# Altium PCB SyncBoard1.PcbDoc (part 4 of 4)
Units mm, origin at the board's own origin, x right, y up, seen from the top; angles counter-clockwise.
Board outline 300 x 250 mm, 2 copper layers (Top Layer, Bottom Layer); 311 components, 299 nets, 1572 pads, 3310 vias.
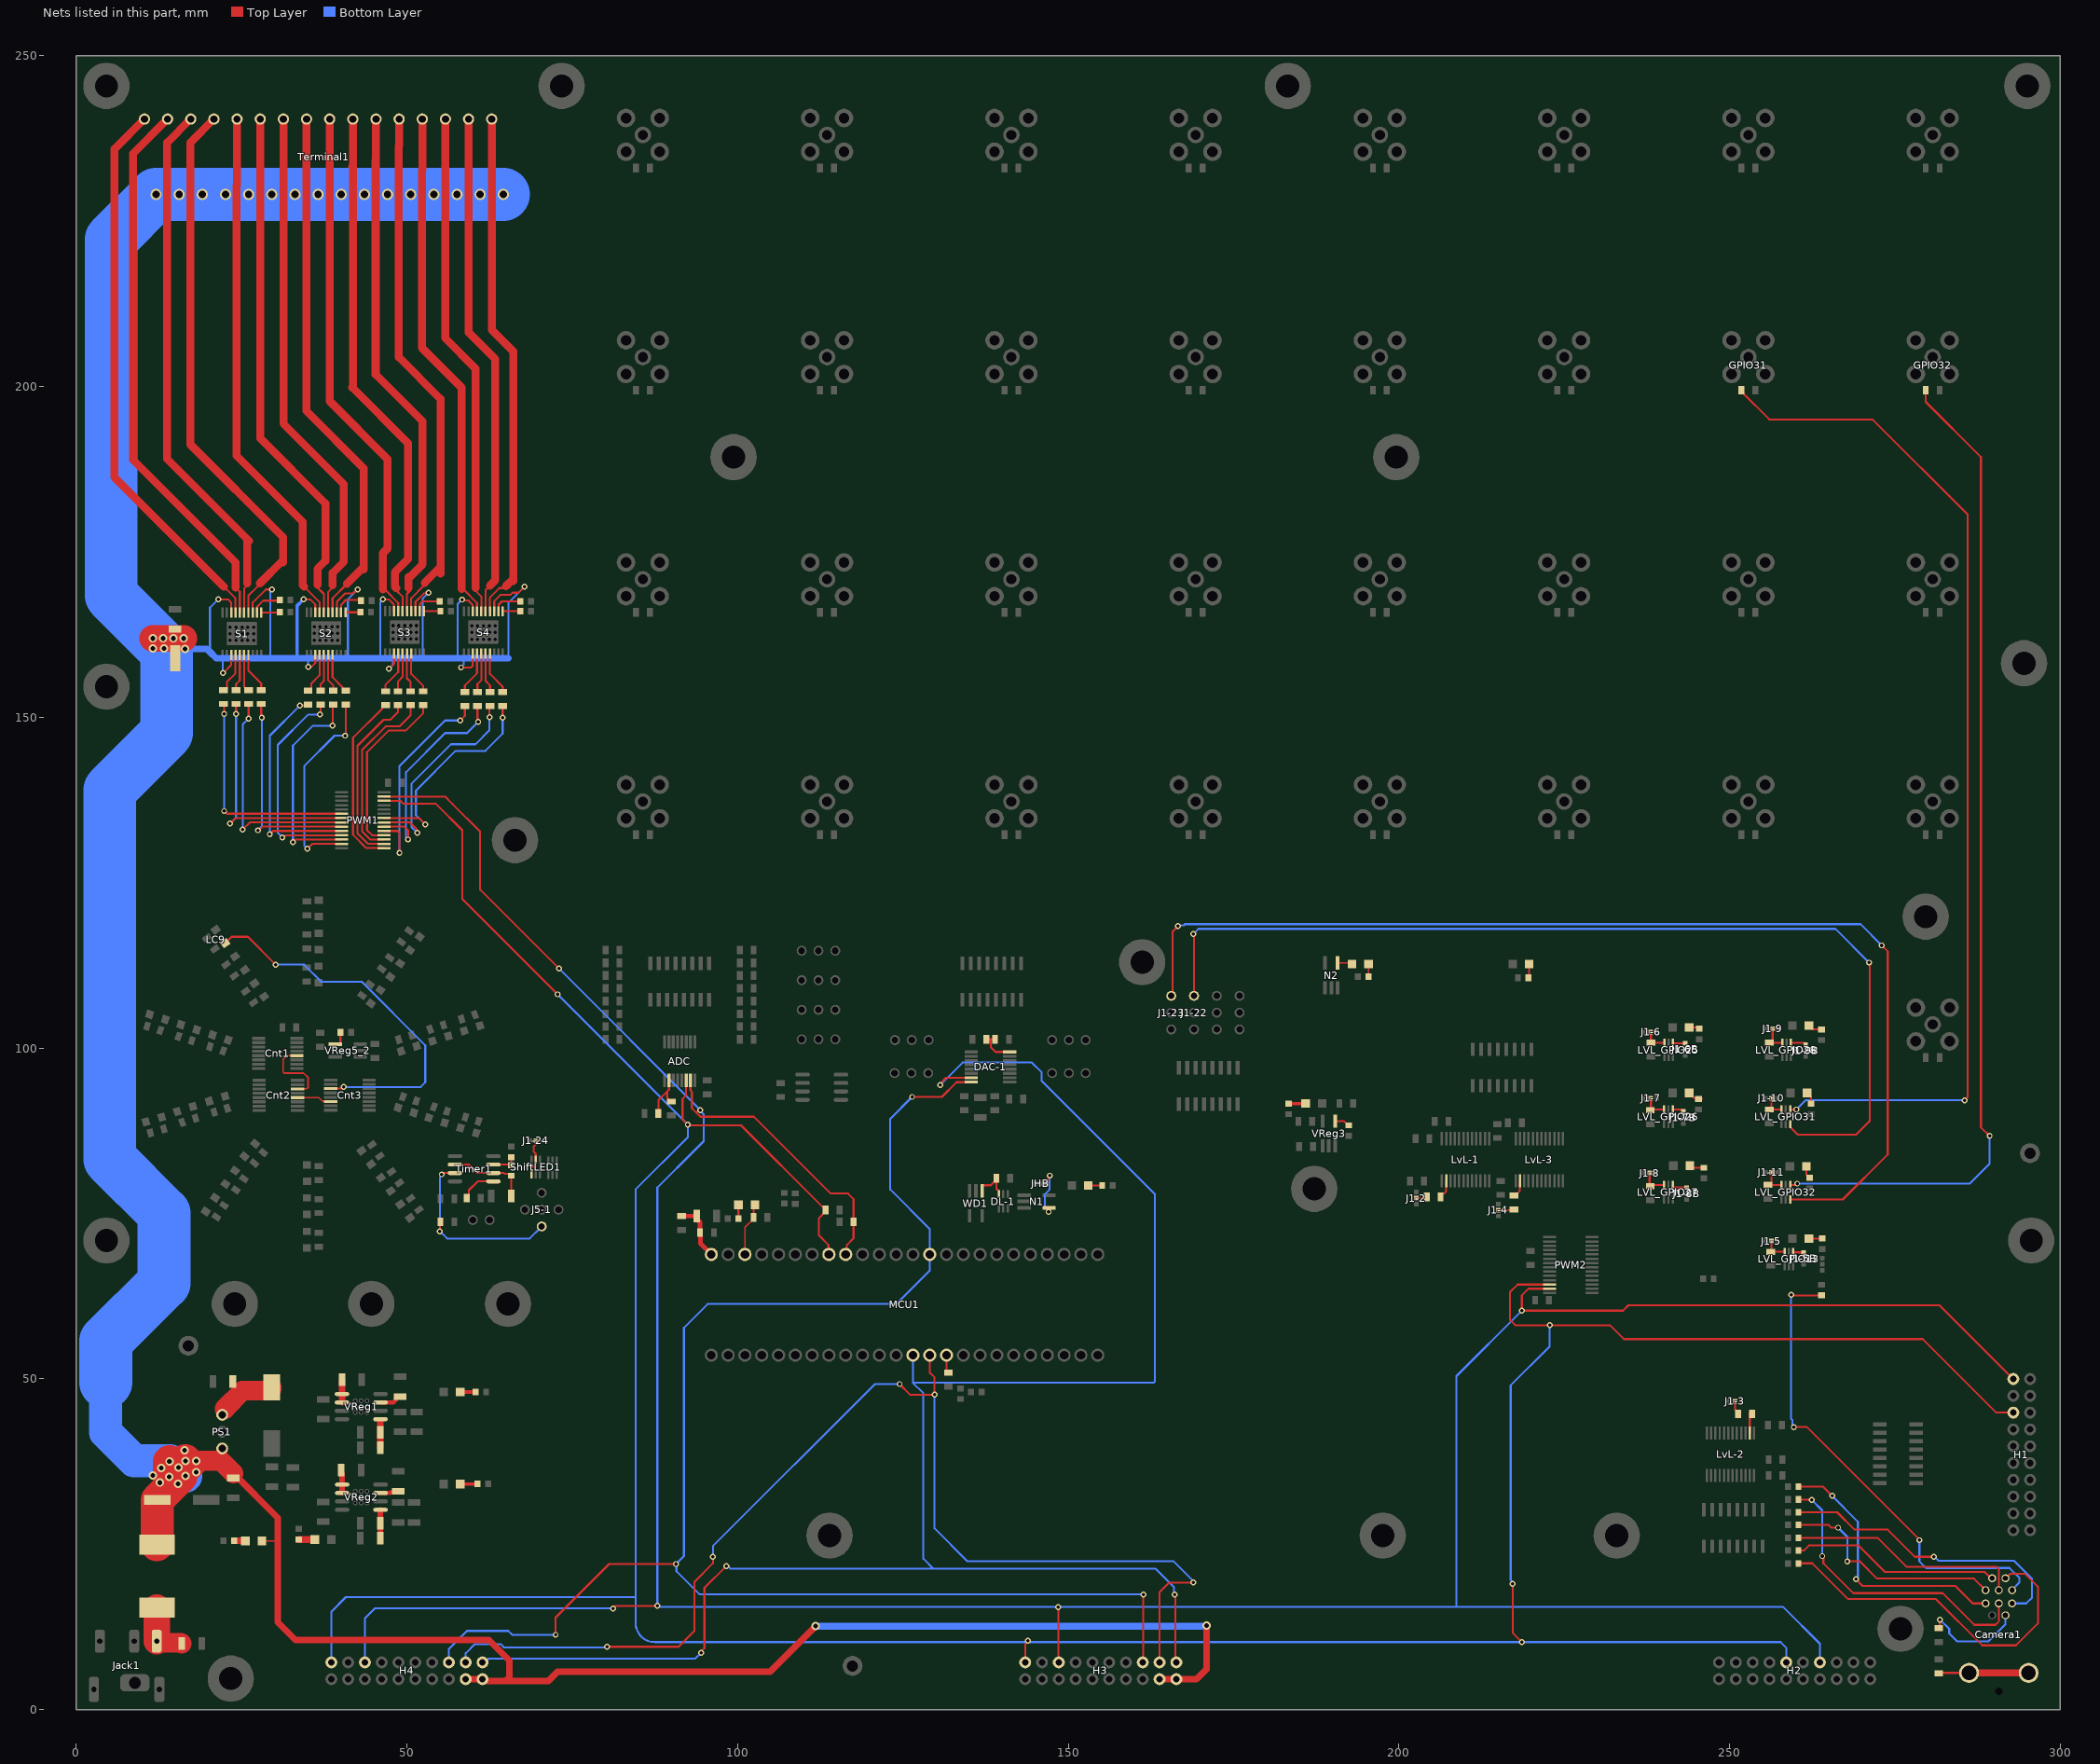
[diagram p4: the nets of this part, all layers, seen from the top]

## Via types
v1: diameter 0.9, hole 0.5, Top Layer to Bottom Layer, tented both sides, 3146 vias
v2: diameter 1.27, hole 0.711, Top Layer to Bottom Layer, tented both sides, 164 vias

## Nets (pads, with @x,y where several pads share a name; then routed paths per layer and width w, separated by ;. In a path a pad name is that pad's centre, name@x,y a point inside that pad or via, vN(x,y) a via of type N, cw(c..) or ccw(c..) an arc to the next point about the centre after c; other vN are vias at no path point) (continued)
LC9: Cnt3.11 LC9.1 | length 57.7
  Top Layer w0.3: LC9.1@22.568,115.843 23.525,116.8 26,116.8 v1(30.2,112.6) ; Cnt3.11@38.5,93.85 40.25,93.85 v1(40.5,94.1)
  Bottom Layer w0.3: v1(30.2,112.6) 34.5,112.6 37.1,110 43.21,110 52.8,100.41 52.8,94.8 52.1,94.1 v1(40.5,94.1)
MISO0: H3.19 H4.19 MCU1.13 | length 181.2
  Top Layer w0.3: v1(80.3,9.5) 91.1,9.5 93.5,11.9 93.5,19.3 96.3,22.1 v1(96.3,23.1) ; v1(124.5,49.2) 126.1,47.6 v1(129.8,47.6) 129.8,50.207 129.066,50.941 MCU1.13@129.066,53.56 ; H3.19@163.82,7.14 163.82,17.72 165.3,19.2 v1@168.7,19.2
  Bottom Layer w0.3: H4.19@58.92,7.14 58.92,8.52 60.3,9.9 64.2,9.9 64.7,9.4 80.2,9.4 v1(80.3,9.5) ; v1(96.3,23.1) 96.3,24.7 120.8,49.2 v1(124.5,49.2) ; v1(129.8,47.6) 129.8,27.376 134.776,22.4 165.939,22.4 168.9,19.439 v1(168.9,19.2)
MOSI0: DAC-1.15 H3.20 H4.20 MCU1.12 | length 275.5
  Top Layer w0.3: v1(94.5,8.6) 94.5,8.761 95,9.261 95,18.4 v1(98.3,21.7) ; v1(130.643,94.414) 130.643,94.609 131.534,95.5 DAC-1.15@135.346,95.5 ; v1(166.1,17.4) 166.23,17.27 166.23,7.27 H3.20@166.36,7.14
  Bottom Layer w0.3: H4.20@61.46,7.14 61.826,7.14 62.386,7.7 93.6,7.7 v1(94.5,8.6) ; v1(98.3,21.7) 98.561,21.7 98.961,21.3 129.6,21.3 ; MCU1.12@126.526,53.56 126.526,49.4 ; v1(130.643,94.414) 134.029,97.8 144.5,97.8 146,96.3 146,95 163.1,77.9 163.1,49.576 162.924,49.4 126.526,49.4 ; v1(166.1,17.4) 166.015,17.485 166.015,18.485 163.2,21.3 129.6,21.3 ; 126.526,49.4 128.1,47.826 128.1,22.8 129.6,21.3
NetADC_10: ADC.10 R3-3.1 R4-4.2 | length 7.6
  Top Layer w0.3: R4-4.2@88.046,90.1 88.046,92.1 89.373,93.427 ; ADC.10@89.646,95.1 89.646,93.7 89.373,93.427 ; R3-3.1@90,91.9 89.8,91.9 89.5,92.2 89.5,92.4 89.373,92.527 89.373,93.427
NetC1-3_2: C1-3.2 C2-2.1 MCU1.47 R4-3.2 | length 9
  Top Layer w0.7: R4-3.2@91.546,74.6 C2-2.1@93.846,74.6 93.846,74.15 94.346,73.65 C1-3.2@94.346,72.1 94.4,72.046 94.4,70.446 MCU1.47@96.046,68.8
NetC1-10_1: C1-10.1 DAC-1.8 R5-9.2 | length 5.6
  Top Layer w0.3: R5-9.2@137.646,101.3 138.296,101.3 ; C1-10.1@138.946,101.3 138.296,101.3 ; DAC-1.8@141.146,99.4 139,99.4 138.296,100.104 138.296,101.3
NetC1-18_2: C1-18.2 J1-5.2 LVL_GPIO13.6 | length 3.7
  Top Layer w0.3: J1-5.2@256.3,70.8 256.3,69.3 C1-18.2@256.2,69.2 LVL_GPIO13.6@258.3,69.2
NetC1-19_2: C1-19.2 J1-6.2 LVL_GPIO25.6 | length 3.6
  Top Layer w0.3: J1-6.2@238.1,102.4 C1-19.2@238.1,100.8 LVL_GPIO25.6@240.15,100.8
NetC1-20_2: C1-20.2 J1-7.2 LVL_GPIO26.6 | length 3.8
  Top Layer w0.3: C1-20.2@238,90.6 C1-20.2@238.1,90.7 ; J1-7.2@238.1,92.4 C1-20.2@238.1,90.7 ; LVL_GPIO26.6@240.1,90.7 C1-20.2@238.1,90.7
NetC1-21_2: C1-21.2 J1-8.2 LVL_GPIO27.6 | length 4.2
  Top Layer w0.3: J1-8.2@237.9,81.1 237.9,79.2 C1-21.2@238,79.1 238.2,79.3 LVL_GPIO27.6@240.1,79.3
NetC1-22_2: C1-22.2 J1-9.2 LVL_GPIO28.6 | length 4.2
  Top Layer w0.3: C1-22.2@256,100.8 C1-22.2@256.2,100.8 ; J1-9.2@256.5,102.9 256.5,101.1 C1-22.2@256.2,100.8 ; LVL_GPIO28.6@257.95,100.8 C1-22.2@256.2,100.8
NetC1-23_2: C1-23.2 J1-10.2 LVL_GPIO31.6 | length 3.7
  Top Layer w0.3: J1-10.2@256.3,92.4 256.3,91 C1-23.2@256,90.7 LVL_GPIO31.6@257.85,90.7
NetC1-24_2: C1-24.2 J1-11.2 LVL_GPIO32.6 | length 4.1
  Top Layer w0.3: C1-24.2@255.8,79.3 C1-24.2@256,79.3 ; J1-11.2@256.3,81.2 256.3,79.6 C1-24.2@256,79.3 ; LVL_GPIO32.6@257.85,79.3 C1-24.2@256,79.3
NetC1-26_1: C1-26.1 Timer1.5 | length 5.6
  Top Layer w0.3: C1-26.1@59.1,77.3 59.4,77.6 59.4,78.5 60.73,79.83 Timer1.5@63.1,79.83
NetC3-3_1: C3-3.1 F0.1 PS1.3 | length 8.7
  Top Layer w3: 22.5,45.4 22.5,45.5 25.2,48.2 29.35,48.2 29.6,48.45 F0.1@29.6,48.7
NetC4-1_1: C4-1.1 C4-2.1 VReg1.1 | length 4
  Top Layer w1: C4-2.1@46,39.6 46,40.05 46.021,40.071 VReg1.1@46.021,43.6
NetC4-6_2: C4-6.2 VReg1.5 VReg1.6 | length 3.5
  Top Layer w1: C4-6.2@40.2,49.9 40.2,49.45 40.221,49.429 VReg1.5@40.221,47.694 VReg1.6@40.221,46.424
NetC4-7_2: C4-7.2 VReg1.3 | length 3.5
  Top Layer w0.6: VReg1.3@46.021,46.424 47.999,46.424 48.35,46.775 48.35,47.1 48.55,47.3 C4-7.2@49,47.3
NetC4-8_1: C4-8.1 C4-9.1 VReg2.1 | length 4.3
  Top Layer w0.8: C4-8.1@46,25.9 46.016,25.916 46.016,30.179 VReg2.1@46.032,30.195
NetC4-13_2: C4-13.2 VReg2.5 VReg2.6 | length 3.5
  Top Layer w0.8: C4-13.2@40.1,36.2 40.1,35.75 40.232,35.618 VReg2.5@40.232,34.005 VReg2.6@40.232,32.735
NetC4-14_2: C4-14.2 VReg2.3 | length 1.7
  Top Layer w0.6: VReg2.3@46.032,32.735 47.535,32.735 47.7,32.9
NetC8-1_2: C8-1.2 VReg3.4 | length 2.3
  Top Layer w0.254: VReg3.4@190.35,88.95 191.7,88.95 192.35,88.3 C8-1.2@192.4,88.3
NetC8-2_2: C8-2.2 VReg5_2.4 | length 2.5
  Top Layer w0.3: VReg5_2.4@39.206,100.557 39.851,100.557 39.976,100.682 C8-2.2@39.976,102.359
NetCamera1_1: Camera1.1 R3-4.2 | length 13.6
  Top Layer w0.3: R3-4.2@281.6,5.5 281.65,5.55 Camera1.1@286.2,5.55
  Top Layer w1: Camera1.1@286.2,5.55 Camera1.1@295.2,5.55
NetCamera1_3: Camera1.3 R3-5.2 | length 15.5
  Top Layer w0.3: R3-5.2@281.6,12.3 281.8,12.5 v1(281.8,13.6)
  Bottom Layer w0.3: v1(281.8,13.6) 283.193,12.207 283.193,11.507 284.4,10.3 289.1,10.3 291.7,12.9 Camera1.3@291.7,14.25
NetCamera1_4: Camera1.4 F1.1 | length 41.1
  Top Layer w0.3: F1.1@260.4,33.7 264.1,33.7 v1(265.5,32.3) ; v1(269.1,19.7) 270.1,18.7 284.1,18.7 286.75,16.05 Camera1.4@288.7,16.05
  Bottom Layer w0.3: v1(265.5,32.3) 269.4,28.4 269.4,20 v1(269.1,19.7)
NetCamera1_5: Camera1.5 F2.1 | length 45.7
  Top Layer w0.254: 290.4,13 290.7,13.3 Camera1.5@290.7,16.05
  Top Layer w0.3: F2.1@260.4,31.767 260.467,31.7 v1(262.4,31.7) ; v1(264,23.2) 264.185,23.015 264.185,22.115 268.7,17.6 282.2,17.6 287,12.8 290.2,12.8 290.4,13
  Bottom Layer w0.3: v1(262.4,31.7) 264,30.1 v1(264,23.2)
NetCamera1_6: Camera1.6 F3.1 | length 45.7
  Top Layer w0.3: F3.1@260.4,29.833 266.267,29.833 268.9,27.2 273.9,27.2 278,23.1 v1(280.9,23.1)
  Bottom Layer w0.3: v1(280.9,23.1) 280.961,23.1 281.561,22.5 293,22.5 295.7,19.8 295.7,16.9 294.85,16.05 Camera1.6@292.7,16.05
NetCamera1_7: Camera1.7 F4.1 | length 34.5
  Top Layer w0.3: F4.1@260.4,27.9 264.973,27.9 265.373,27.5 v1(266.4,27.5) ; v1(267.8,22.4) 269.7,22.4 272.3,19.8 286.95,19.8 Camera1.7@288.7,18.05
  Bottom Layer w0.3: v1(266.4,27.5) 267.8,26.1 v1(267.8,22.4)
NetCamera1_8: Camera1.8 F5.1 | length 35.4
  Top Layer w0.254: 290.6,21.3 290.7,21.2 Camera1.8@290.7,18.05
  Top Layer w0.3: F5.1@260.4,25.967 272.333,25.967 276.7,21.6 290.3,21.6 290.6,21.3
NetCamera1_9: Camera1.9 F6.1 | length 72.6
  Top Layer w0.3: v1(259.3,62.7) 259.4,62.6 F6.1@263.9,62.6 ; v1(259.7,42.7) 261.7,42.7 278.7,25.7 v1(278.7,25.6)
  Bottom Layer w0.3: v1(259.3,62.7) 259.3,43.935 259.514,43.721 259.514,42.886 v1(259.7,42.7) ; v1(278.7,25.6) 278.7,22.4 279.7,21.4 292.3,21.4 293.8,19.9 293.8,19.2 292.7,18.1 Camera1.9@292.7,18.05
NetCamera1_10: Camera1.10 F7.1 | length 31.7
  Top Layer w0.3: F7.1@260.4,24.033 261.233,24.033 262,24.8 269.5,24.8 273.5,20.8 288.565,20.8 289.515,19.85 Camera1.10@289.7,19.85
NetCamera1_11: Camera1.11 F8.1 | length 54.3
  Top Layer w0.3: F8.1@260.4,22.1 262.5,22.1 267.9,16.7 281.2,16.7 288.2,9.7 293.3,9.7 296.6,13 296.6,18.6 294.7,20.5 292.4,20.5 291.75,19.85 Camera1.11@291.7,19.85
NetCnt1_12: Cnt1.12 Cnt2.14 | length 11.6
  Top Layer w0.254: Cnt1.12@33.4,98.85 31.85,98.85 31.3,98.3 31.3,96.349 31.449,96.2 34.4,96.2 35.1,95.5 35.1,94.027 34.951,93.878 ; Cnt2.14@33.5,93.8 Cnt2.14@33.578,93.878 ; Cnt2.14@33.578,93.828 34.951,93.828
NetCnt2_12: Cnt2.12 Cnt3.14 | length 5.2
  Top Layer w0.254: Cnt2.12@33.5,92.5 36.7,92.5 37.272,91.928 38.472,91.928 Cnt3.14@38.5,91.9
NetDIR_13=OUT_1: DIR_13=OUT.1 R6-1.1 | length 2
  Top Layer w0.3: DIR_13=OUT.1@262,71.2 R6-1.1@264,71.2
NetDIR_25=OUT_1: DIR_25=OUT.1 R6-2.1 | length 1.5
  Top Layer w0.3: DIR_25=OUT.1@243.9,103.1 R6-2.1@245.45,103.1
NetDIR_26=OUT_1: DIR_26=OUT.1 R6-3.1 | length 2.3
  Top Layer w0.3: DIR_26=OUT.1@243.9,93.2 244.8,92.3 R6-3.1@245.8,92.3
NetDIR_27=OUT_1: DIR_27=OUT.1 R6-4.1 | length 1.9
  Top Layer w0.3: DIR_27=OUT.1@244,82.2 244.3,81.9 R6-4.1@245.819,81.9
NetDIR_28=OUT_1: DIR_28=OUT.1 R6-5.1 | length 2.1
  Top Layer w0.3: DIR_28=OUT.1@262,103.4 262.6,102.8 R6-5.1@263.9,102.8
NetDIR_31=OUT_1: DIR_31=OUT.1 R6-6.1 | length 1.8
  Top Layer w0.3: DIR_31=OUT.1@261.7,93.2 262.3,92.6 R6-6.1@262.3,91.6
NetDIR_32=OUT_1: DIR_32=OUT.1 R6-7.1 | length 1.9
  Top Layer w0.3: DIR_32=OUT.1@261.6,82.1 261.6,80.85 262.05,80.4 R6-7.1@262.1,80.4
NetDL-1_6: DL-1.6 R1-30.2 WD1.1 | length 5.8
  Top Layer w0.3: WD1.1@136.996,78.4 136.996,79.125 137.121,79.25 138.296,79.25 R1-30.2@139.146,80.1 ; R1-30.2@139.146,80.3 R1-30.2@139.146,80.1 ; DL-1.6@139.546,77.9 139.546,78.325 139.146,78.725 R1-30.2@139.146,80.1
NetJ1-2_2: J1-2.2 R1-8.2 | length 1.7
  Top Layer w0.3: J1-2.2@202.6,77.3 204,77.3 R1-8.2@204.2,77.5
NetJ1-3_2: J1-3.2 R1-10.2 | length 2.5
  Top Layer w0.3: J1-3.2@250.8,46.6 250.8,45.4 R1-10.2@251.25,44.95 ; R1-10.2@251,44.7 R1-10.2@251.25,44.95 ; R1-10.2@251.3,44.7 251.3,44.9 R1-10.2@251.25,44.95 ; R1-10.2@251.3,45 R1-10.2@251.25,44.95
NetJ1-4_2: J1-4.2 R1-12.2 | length 2.4
  Top Layer w0.3: J1-4.2@215,75.5 217.3,75.5 R1-12.2@217.4,75.6
NetJ1-5B_1: J1-5B.1 LVL_GPIO13.4 | length 1.7
  Top Layer w0.3: LVL_GPIO13.4@259.6,69.2 259.6,69.125 259.625,69.1 J1-5B.1@261.2,69.1
NetJ1-6B_1: J1-6B.1 LVL_GPIO25.4 | length 1.9
  Top Layer w0.3: LVL_GPIO25.4@241.45,100.8 241.45,100.725 241.475,100.7 J1-6B.1@243.3,100.7
NetJ1-7B_1: J1-7B.1 LVL_GPIO26.4 | length 1.7
  Top Layer w0.3: LVL_GPIO26.4@241.4,90.7 242.7,90.7 J1-7B.1@243,90.4
NetJ1-8B_1: J1-8B.1 LVL_GPIO27.4 | length 2.5
  Top Layer w0.3: LVL_GPIO27.4@241.4,79.3 241.4,78.925 241.425,78.9 J1-8B.1@243.5,78.9
NetJ1-9B_1: J1-9B.1 LVL_GPIO28.4 | length 2.4
  Top Layer w0.3: LVL_GPIO28.4@259.25,100.8 261.2,100.8 J1-9B.1@261.5,100.5
NetJ1-24_2: J1-24.2 ShiftLED1.1 ShiftLED1.5 | length 5.8
  Top Layer w0.254: ShiftLED1.1@68.85,80.9 68.85,81.85 69,82 69.351,82 69.5,82.149 ShiftLED1.5@69.5,83.1
  Top Layer w0.3: ShiftLED1.5@69.5,83.1 69.5,84 69.2,84.3 69.2,85.1 69.5,85.4 J1-24.2@69.5,86
NetJHB_1: JHB.1 N1.4 | length 8.1
  Top Layer w0.3: JHB.1@146.7,79.5 146.9,79.7 146.9,80.138 147.2,80.438 v1(147.2,80.7) ; v1(147.041,75.218) 147.041,75.795 N1.4@147.096,75.85
  Bottom Layer w0.3: v1(147.041,75.218) 147.041,75.38 146.5,75.922 146.5,77.9 147.2,78.6 v1(147.2,80.7)
NetLED1-8_1: LED1-8.1 R6-8.1 | length 2.6
  Top Layer w0.5: R6-8.1@183.3,91.6 LED1-8.1@185.9,91.6
NetLED1-9_1: LED1-9.1 R6-9.1 | length 2.4
  Top Layer w1: R6-9.1@33.7,25.7 LED1-9.1@36.1,25.7
NetLED1-10_1: LED1-10.1 R6-10.1 | length 2.3
  Top Layer w0.5: LED1-10.1@58.1,48 R6-10.1@60.4,48
NetLED1-11_1: LED1-11.1 R6-11.1 | length 2.6
  Top Layer w0.5: LED1-11.1@58.1,34.1 R6-11.1@60.7,34.1
NetLED1-12_1: LED1-12.1 R6-12.1 | length 1.7
  Top Layer w1: R6-12.1@23.9,25.5 LED1-12.1@25.6,25.5
NetLED1-13_1: LED1-13.1 R6-13.1 | length 2.1
  Top Layer w0.3: R6-13.1@100.146,74.2 LED1-13.1@100.146,76.3
NetLED1-13_2: LED1-13.2 MCU1.45 R4-5.2 | length 8.1
  Top Layer w0.254: MCU1.45@101.126,68.8 101.126,72.88 102.446,74.2 R4-5.2@102.446,74.4 102.446,76.1 LED1-13.2@102.646,76.3
NetLED1-14_1: LED1-14.1 R6-14.1 | length 2.1
  Top Layer w0.3: LED1-14.1@153.046,79.2 R6-14.1@155.146,79.2
NetLvL-1_2: LvL-1.2 R1-8.1 | length 2.9
  Top Layer w0.3: R1-8.1@206.3,77.5 206.3,77.7 206.6,78 206.8,78 207.15,78.35 LvL-1.2@207.15,79.9
NetLvL-2_2: LvL-2.2 R1-10.1 | length 3.1
  Top Layer w0.3: LvL-2.2@253.05,41.8 R1-10.1@253.05,44.85
NetLvL-3_2: LvL-3.2 R1-12.1 | length 2.7
  Top Layer w0.3: R1-12.1@217.4,77.7 217.6,77.7 218.3,78.4 LvL-3.2@218.3,79.9
NetMCU1_14: MCU1.14 R4-5B.2 | length 2.8
  Top Layer w0.3: MCU1.14@131.606,53.56 131.606,51.194 R4-5B.2@131.9,50.9
NetN2_4: N2.4 OK.2 | length 2.2
  Top Layer w0.254: N2.4@190.75,112.85 192.75,112.85 OK.2@192.9,112.7
NetNOT_OK_1: NOT_OK.1 R6-1B.1 | length 2.1
  Top Layer w0.3: R6-1B.1@219.6,110.6 219.7,110.7 NOT_OK.1@219.7,112.7
NetOK_1: OK.1 R6-2B.1 | length 1.9
  Top Layer w0.254: R6-2B.1@195.4,110.8 OK.1@195.4,112.7
NetR1-14_1: R1-14.1 S1.5 | length 5.5
  Top Layer w0.3: R1-14.1@24.2,154.1 24.2,155 24.764,155.564 S1.5@24.764,159.4
NetR1-15_1: R1-15.1 S1.4 | length 6.2
  Top Layer w0.3: R1-15.1@22.3,154.1 22.5,154.1 22.8,154.4 22.8,155.3 24.114,156.614 S1.4@24.114,159.4
NetR1-16_1: R1-16.1 S1.6 | length 5.7
  Top Layer w0.3: S1.6@25.414,159.4 25.414,154.586 25.9,154.1 R1-16.1@26.1,154.1
NetR1-17_1: R1-17.1 S1.7 | length 6.1
  Top Layer w0.3: S1.7@26.064,159.4 26.064,157.036 28,155.1 R1-17.1@28,154.1
NetR1-18_1: R1-18.1 S2.4 | length 6.3
  Top Layer w0.3: R1-18.1@35.1,154 35.3,154 35.6,154.3 35.6,155.1 36.825,156.325 S2.4@36.825,159.45
NetR1-19_1: R1-19.1 S2.5 | length 5.6
  Top Layer w0.3: R1-19.1@37,154 37,155 37.475,155.475 S2.5@37.475,159.45
NetR1-20_1: R1-20.1 S2.6 | length 5.8
  Top Layer w0.3: S2.6@38.125,159.45 38.125,155.575 38.9,154.8 R1-20.1@38.9,154
NetR1-21_1: R1-21.1 S2.7 | length 6.4
  Top Layer w0.3: S2.7@38.775,159.45 38.775,156.025 40.3,154.5 40.3,154.3 40.6,154 R1-21.1@40.8,154
NetR1-22_1: R1-22.1 S3.4 | length 6.5
  Top Layer w0.3: R1-22.1@46.8,153.9 46.8,154.9 48.725,156.825 S3.4@48.725,159.616
NetR1-23_1: R1-23.1 S3.5 | length 6
  Top Layer w0.3: R1-23.1@48.7,153.9 48.7,155.4 49.375,156.075 S3.5@49.375,159.616
NetR1-24_1: R1-24.1 S3.6 | length 6
  Top Layer w0.3: S3.6@50.025,159.616 50.025,155.875 50.6,155.3 R1-24.1@50.6,153.9
NetR1-25_1: R1-25.1 S3.7 | length 6.5
  Top Layer w0.3: S3.7@50.675,159.616 50.675,156.525 52.5,154.7 R1-25.1@52.5,153.9
NetR1-26_1: R1-26.1 S4.4 | length 6.6
  Top Layer w0.3: R1-26.1@58.8,153.8 58.8,154.8 60.625,156.625 S4.4@60.625,159.6
NetR1-27_1: R1-27.1 S4.5 | length 6
  Top Layer w0.3: R1-27.1@60.7,153.8 60.7,155 61.275,155.575 S4.5@61.275,159.6
NetR1-28_1: R1-28.1 S4.6 | length 6.1
  Top Layer w0.3: S4.6@61.925,159.6 61.925,155.475 62.6,154.8 R1-28.1@62.6,153.8
NetR1-29_1: R1-29.1 S4.7 | length 6.6
  Top Layer w0.3: S4.7@62.575,159.6 62.575,156.525 64.5,154.6 R1-29.1@64.5,153.8
NetR7-1_1: R7-1.1 S1.12 | length 4.9
  Top Layer w0.3: S1.12@27.364,165.8 27.364,166.664 28.3,167.6 R7-1.1@31,167.6
NetR7-2_1: R7-2.1 S1.11 | length 2.8
  Top Layer w0.3: S1.11@28.014,165.8 R7-2.1@30.8,165.8
NetR7-3_1: R7-3.1 S2.12 | length 4.6
  Top Layer w0.3: S2.12@40.075,165.85 40.1,165.875 40.1,167 40.8,167.7 R7-3.1@43.2,167.7
NetR7-4_1: R7-4.1 S2.11 | length 2.6
  Top Layer w0.3: S2.11@40.725,165.85 R7-4.1@43.3,165.85
NetR7-5_1: R7-5.1 S3.12 | length 4.6
  Top Layer w0.3: S3.12@51.975,166.016 51.975,167.075 52.4,167.5 R7-5.1@55.3,167.5
NetR7-6_1: R7-6.1 S3.11 | length 2.8
  Top Layer w0.3: S3.11@52.625,166.016 55.384,166.016 R7-6.1@55.4,166
NetR7-7_1: R7-7.1 S4.12 | length 4.5
  Top Layer w0.3: S4.12@63.875,166 63.9,166.025 63.9,167 64.4,167.5 R7-7.1@67.2,167.5
NetR7-8_1: R7-8.1 S4.11 | length 2.7
  Top Layer w0.3: S4.11@64.525,166 R7-8.1@67.2,166
NetR9-1_2: R9-1.2 R9-2.1 Timer1.7 | length 3.9
  Top Layer w0.3: Timer1.7@63.1,82.37 65.73,82.37 R9-1.2@65.8,82.3 R9-2.1@65.8,83.5
P0: PWM1.6 R1-15.2 | length 34.2
  Top Layer w0.3: R1-15.2@22.3,152 22.4,151.9 v1(22.4,150.5) ; v1(22.4,135.8) 22.8,135.4 PWM1.6@40.146,135.4
  Bottom Layer w0.3: v1(22.4,135.8) v1(22.4,150.5)
P1: PWM1.7 R1-14.2 | length 35.7
  Top Layer w0.3: v1(23.3,133.9) 24.15,134.75 PWM1.7@40.146,134.75 ; v1(24.2,150.5) R1-14.2@24.2,152
  Bottom Layer w0.3: v1(23.3,133.9) 24.2,134.8 v1(24.2,150.5)
P2: PWM1.8 R1-16.2 | length 34.8
  Top Layer w0.3: v1(25.2,133) 26.3,134.1 PWM1.8@40.146,134.1 ; v1(26.1,149.8) R1-16.2@26.1,152
  Bottom Layer w0.3: v1(25.2,133) 25.2,148.9 v1(26.1,149.8)
P3: PWM1.9 R1-17.2 | length 32.3
  Top Layer w0.3: v1(27.5,132.9) 27.662,132.9 28.212,133.45 PWM1.9@40.146,133.45 ; R1-17.2@28,152 28,150 v1(28.1,149.9)
  Bottom Layer w0.3: v1(27.5,132.9) 28.1,133.5 v1(28.1,149.9)
P4: PWM1.10 R1-18.2 | length 33.7
  Top Layer w0.3: v1(29.3,132.3) 29.8,132.8 PWM1.10@40.146,132.8 ; v1(33.859,151.759) 34.959,151.759 R1-18.2@35.1,151.9
  Bottom Layer w0.3: v1(29.3,132.3) 29.3,147.2 v1(33.859,151.759)
P5: PWM1.11 R1-19.2 | length 33.2
  Top Layer w0.3: v1(31.2,131.8) 31.362,131.8 31.712,132.15 PWM1.11@40.146,132.15 ; v1(36.897,150.397) 37,150.5 R1-19.2@37,151.9
  Bottom Layer w0.3: v1(31.2,131.8) 30.5,132.5 30.5,145.8 35.097,150.397 v1(36.897,150.397)
P6: PWM1.12 R1-20.2 | length 32.7
  Top Layer w0.3: v1(32.8,131.1) 32.8,131.262 33,131.462 33,131.5 PWM1.12@40.146,131.5 ; v1(38.8,148.7) 38.8,151.8 R1-20.2@38.9,151.9
  Bottom Layer w0.3: v1(32.8,131.1) 32.8,145.7 35.8,148.7 v1(38.8,148.7)
P7: PWM1.13 R1-21.2 | length 31
  Top Layer w0.3: v1(35,130.1) 35.75,130.85 PWM1.13@40.146,130.85 ; v1(40.7,147.2) 40.8,147.3 R1-21.2@40.8,151.9
  Bottom Layer w0.3: v1(35,130.1) 34.5,130.6 34.5,142.6 39.1,147.2 v1(40.7,147.2)
P8: PWM1.15 R1-22.2 | length 27.2
  Top Layer w0.3: PWM1.15@46.546,130.2 46.521,130.225 43.875,130.225 41.889,132.211 41.889,146.889 46.3,151.3 46.3,151.5 46.6,151.8 R1-22.2@46.8,151.8
P9: PWM1.16 R1-23.2 | length 27.1
  Top Layer w0.3: PWM1.16@46.546,130.85 44.15,130.85 42.55,132.45 42.55,145.65 46.5,149.6 47.5,149.6 48.7,150.8 R1-23.2@48.7,151.8
P10: PWM1.17 R1-24.2 | length 27.1
  Top Layer w0.3: PWM1.17@46.546,131.5 44.5,131.5 43.251,132.749 43.251,145.051 46.8,148.6 48.9,148.6 50.6,150.3 R1-24.2@50.6,151.8
P11: PWM1.18 R1-25.2 | length 26.8
  Top Layer w0.3: PWM1.18@46.546,132.15 44.75,132.15 44,132.9 44,144.7 47.3,148 49.9,148 52.5,150.6 R1-25.2@52.5,151.8
P12: PWM1.19 R1-26.2 | length 33.1
  Top Layer w0.3: PWM1.19@46.546,132.8 48.6,132.8 48.9,132.5 v1(48.9,129.5) ; v1(58.1,149.5) 58.8,150.2 R1-26.2@58.8,151.7
  Bottom Layer w0.3: v1(48.9,129.5) 48.9,142.6 55.8,149.5 v1(58.1,149.5)
P13: PWM1.20 R1-27.2 | length 32.1
  Top Layer w0.3: PWM1.20@46.546,133.45 49.65,133.45 50.2,132.9 v1(50.2,131.5) ; R1-27.2@60.7,151.7 60.7,149.4 v1(60.8,149.3)
  Bottom Layer w0.3: v1(50.2,131.5) 49.9,131.8 49.9,141.7 55.8,147.6 59.1,147.6 v1(60.8,149.3)
P14: PWM1.21 R1-28.2 | length 32.7
  Top Layer w0.3: PWM1.21@46.546,134.1 50.5,134.1 51.5,133.1 51.5,132.6 v1(51.6,132.5) ; v1(62.5,150) 62.5,151.6 R1-28.2@62.6,151.7
  Bottom Layer w0.3: v1(51.6,132.5) 50.7,133.4 50.7,139.9 56.7,145.9 60.4,145.9 62.5,148 v1(62.5,150)
P15: PWM1.22 R1-29.2 | length 33.2
  Top Layer w0.3: PWM1.22@46.546,134.75 51.85,134.75 v1(52.8,133.8) ; v1(64.5,149.9) R1-29.2@64.5,151.7
  Bottom Layer w0.3: v1(52.8,133.8) 51.4,135.2 51.4,138.9 57.4,144.9 61.9,144.9 64.5,147.5 v1(64.5,149.9)
Po0: S1.17 Terminal1.2 | length 84.1
  Top Layer w0.3: 22.361,169.7 24.114,167.947 S1.17@24.114,165.8
  Top Layer w1.2: Terminal1.2@10.35,240.4 5.8,235.85 5.8,186.261 22.361,169.7
Po1: S1.16 Terminal1.4 | length 83.5
  Top Layer w0.3: 24.1,169.6 24.764,168.936 S1.16@24.764,165.8
  Top Layer w1.2: Terminal1.4@13.85,240.4 8.6,235.15 8.6,188.9 24.1,173.4 24.1,169.6
Po2: S1.15 Terminal1.6 | length 81.2
  Top Layer w0.3: S1.15@25.414,165.8 25.414,169.414 26,170
  Top Layer w1.2: Terminal1.6@17.35,240.4 13.8,236.85 13.8,189 26.2,176.6 ; 25.9,170.2 25.9,176.6
Po3: S1.14 Terminal1.8 | length 83.8
  Top Layer w0.3: S1.14@26.064,165.8 26.064,168.364 27.5,169.8
  Top Layer w1.2: Terminal1.8@20.85,240.4 17.3,236.85 17.3,191.2 31.3,177.2 31.3,173.4 ; 27.8,170.2 31.3,173.7
Po4: S2.17 Terminal1.10 | length 79.8
  Top Layer w0.3: 34.5,169.7 36.825,167.375 S2.17@36.825,165.85
  Top Layer w1.2: Terminal1.10@24.35,240.4 24.35,230.376 24.3,230.326 24.3,189.5 34.3,179.5 34.3,169.9 34.5,169.7
Po5: S2.16 Terminal1.12 | length 79.1
  Top Layer w0.3: 36.5,169.6 37.475,168.625 S2.16@37.475,165.85
  Top Layer w1.2: Terminal1.12@27.85,240.4 27.85,192.15 37.7,182.3 37.7,173.63 36.5,172.43 36.5,170
Po6: S2.15 Terminal1.14 | length 79.2
  Top Layer w0.3: S2.15@38.125,165.85 38.125,168.925 38.9,169.7
  Top Layer w1.2: Terminal1.14@31.35,240.4 31.35,194.35 40.5,185.2 40.5,173.5 38.8,171.8 38.8,169.9
Po7: S2.14 Terminal1.16 | length 80.5
  Top Layer w0.3: S2.14@38.775,165.85 38.775,167.948 41,170.173
  Top Layer w1.2: Terminal1.16@34.85,240.4 34.85,196.25 43.5,187.6 43.5,172.3 ; 41,170.173 41,170.2 43.5,172.7
Po8: S3.17 Terminal1.18 | length 79.1
  Top Layer w0.3: 46.7,169.3 48.725,167.275 S3.17@48.725,166.016
  Top Layer w1.2: Terminal1.18@38.35,240.4 38.35,197.75 47.1,189 47.1,175.5 46.4,174.8 46.4,169.3
Po9: S3.16 Terminal1.20 | length 78.9
  Top Layer w0.3: 48.4,169.2 49.375,168.225 S3.16@49.375,166.016
  Top Layer w1.2: 41.775,199.825 50.2,191.4 50.2,173.9 48.2,171.9 48.2,169.7 48.4,169.5 ; 41.775,233.234 41.85,233.309 Terminal1.20@41.85,240.4 ; 41.865,199.825 41.865,233.234
Po10: S3.15 Terminal1.22 | length 78.1
  Top Layer w0.3: S3.15@50.025,166.016 50.025,168.625 50.6,169.2
  Top Layer w1.2: Terminal1.22@45.35,240.4 45.35,234.179 45.3,234.129 45.3,201.8 52.4,194.7 52.4,173.1 50.5,171.2 ; 50.3,169.5 50.3,171.2
Po11: S3.14 Terminal1.24 | length 79.5
  Top Layer w0.3: S3.14@50.675,166.016 50.675,167.975 52.7,170
  Top Layer w1.2: Terminal1.24@48.85,240.4 48.85,236.35 48.8,236.3 48.8,204.4 55.1,198.1 55.1,172.7 ; 52.7,170.3 55.1,172.7 ; 55.1,171.7 55.1,172.7
Po12: S4.17 Terminal1.26 | length 78
  Top Layer w0.3: 58.3,169.4 58.5,169.4 60.625,167.275 60.625,166.225 60.6,166.2 60.625,166.175 S4.17@60.625,166
  Top Layer w1.2: Terminal1.26@52.35,240.4 52.35,232.75 52.3,232.7 52.3,205.8 58.3,199.8 58.3,169.4
Po13: S4.16 Terminal1.28 | length 76.2
  Top Layer w0.3: 60.4,169.1 61.275,168.225 S4.16@61.275,166
  Top Layer w1.2: Terminal1.28@55.85,240.4 55.85,207.25 60.4,202.7 60.4,169.5
Po14: S4.15 Terminal1.30 | length 77.1
  Top Layer w0.3: S4.15@61.925,166 61.925,169.225 62.567,169.867 62.735,169.53
  Top Layer w1.2: Terminal1.30@59.35,240.4 59.35,208.15 63.4,204.1 63.4,170.7 62.567,169.867
Po15: S4.14 Terminal1.32 | length 77.8
  Top Layer w0.3: S4.14@62.575,166 62.575,168.075 64,169.5 65,169.5
  Top Layer w1.2: Terminal1.32@62.85,240.4 62.85,208.55 66.1,205.3 66.1,170.6 ; 65,169.8 66.1,170.9
PWM0: GPIO31.1 LVL_GPIO31.4 | length 157.8
  Top Layer w0.3: GPIO31.1@251.793,199.415 251.793,199.215 256.008,195 271.6,195 286,180.6 286,92.6 v1(285.5,92.1) ; LVL_GPIO31.4@259.15,90.7 v1(260.1,90.7)
  Bottom Layer w0.3: v1(260.1,90.7) 261.5,92.1 v1(285.5,92.1)
PWM0*: J1-22.3 LVL_GPIO31.3 | length 151.8
  Top Layer w0.3: v1(168.9,117.2) 169.024,117.076 J1-22.3@169.024,107.88 ; LVL_GPIO31.3@259.15,88.5 259.15,88.075 260.325,86.9 269.1,86.9 271.2,89 271.2,112.8 v1(271.1,112.9)
  Bottom Layer w0.3: v1(168.9,117.2) 169.7,118 266,118 v1(271.1,112.9)
PWM1: GPIO32.1 LVL_GPIO32.4 | length 152.4
  Top Layer w0.3: LVL_GPIO32.4@259.15,79.3 260,79.3 v1(260.2,79.5) ; GPIO32.1@279.65,199.415 279.65,197.65 288,189.3 288,88 v1(289.3,86.7)
  Bottom Layer w0.3: v1(260.2,79.5) 286.3,79.5 289.3,82.5 v1(289.3,86.7)
PWM1*: J1-23.3 LVL_GPIO32.3 | length 168.3
  Top Layer w0.3: J1-23.3@165.579,107.88 165.785,108.086 165.785,117.585 v1(166.6,118.4) ; LVL_GPIO32.3@259.15,77.1 267.1,77.1 273.9,83.9 273.9,114.6 v1(273,115.5)
  Bottom Layer w0.3: v1(166.6,118.4) 166.715,118.515 167.465,118.515 167.65,118.7 269.8,118.7 v1(273,115.5)
SCK0: DAC-1.16 H3.18 H4.18 MCU1.34 | length 244.1
  Top Layer w0.3: v1(72.5,11.3) 72.5,13.9 80.6,22 v1(90.7,22) ; v1(126.4,92.6) 130.9,92.6 133.117,94.817 135.313,94.817 DAC-1.16@135.346,94.85 ; H3.18@161.28,7.14 161.34,7.2 161.34,17.34 v1(161.4,17.4)
  Bottom Layer w0.3: H4.18@56.38,7.14 56.38,9.18 59.1,11.9 65.369,11.9 65.969,11.3 v1(72.5,11.3) ; v1(126.4,92.6) 123.1,89.3 123.1,78.6 129.066,72.634 MCU1.34@129.066,68.8 129.066,66.366 124,61.3 95.5,61.3 91.9,57.7 91.9,23.2 v1(90.7,22) 90.785,21.915 90.785,20.915 94.3,17.4 v1(161.4,17.4)
SCL0: ADC.14 H1.18 H2.15 H3.11 H4.11 MCU1.40 PWM1.26 PWM2.26 R1-5.2 | length 572.3
  Top Layer w0.3: PWM1.26@46.546,137.35 49.05,137.35 49.5,136.9 54.4,136.9 58.4,132.9 58.4,122.5 v1(72.8,108.1) ; 92.24,92.9 ADC.14@92.24,95.046 ; ADC.14@92.246,95.1 ADC.14@92.3,95.046 ; 92.3,92.9 91.7,92.3 91.7,89.2 v1(92.5,88.4) 92.6,88.3 100.546,88.3 112.846,76 113.046,76 113.346,75.7 R1-5.2@113.346,75.5 113.346,75.3 112.3,74.254 112.3,71.7 113.75,70.25 113.75,68.876 MCU1.40@113.826,68.8 ; H3.11@143.5,7.14 143.5,9.838 143.9,10.238 v1(143.9,10.4) ; v1(217.2,19) 217.2,11.6 v1(218.6,10.2) ; PWM2.26@222.8,64.25 217.95,64.25 216.8,63.1 216.8,58.9 217.6,58.1 v1(222.8,58.1) 231.9,58.1 234,56 279.2,56 290.317,44.883 H1.18@292.881,44.883
  Bottom Layer w0.3: H4.11@38.6,7.14 38.6,14.8 40.8,17 84.6,17 ; v1(72.8,108.1) v1(92.5,88.4) 92.5,86.5 84.6,78.6 84.6,17 ; v1(143.9,10.4) v1@143.7,10.2 ; v1(217.2,19) 217.2,19.262 216.9,19.562 216.9,49 222.8,54.9 v1(222.8,58.1) ; H2.15@258.56,7.14 258.56,9.34 257.7,10.2 v1(218.6,10.2) 206.8,10.2 v1@143.7,10.2 ; 84.6,17 84.6,13.1 ccw(c87.5,13.1) 87.5,10.2 v1@143.7,10.2
SDA0: ADC.15 H1.20 H2.17 H3.13 H4.13 MCU1.39 PWM1.27 PWM2.27 R1-6.2 | length 570.7
  Top Layer w0.3: PWM1.27@46.546,138 55.8,138 56.9,136.9 61.1,132.7 61.1,123.9 v1(73,112) ; v1(81.2,15.3) 81.576,15.676 v1(87.9,15.676) ; ADC.15@92.896,95.1 92.896,93.604 93.1,93.4 93.1,90.9 93.75,90.25 ; v1(94.4,90.6) 94.138,90.6 93.788,90.25 93.75,90.25 ; MCU1.39@116.366,68.8 116.55,68.984 116.55,70.25 117.546,71.246 R1-6.2@117.546,73.7 117.546,77.154 116.7,78 114.1,78 102.5,89.6 94.4,89.6 93.75,90.25 ; v1(148.5,15.5) 148.54,15.46 148.54,7.18 H3.13@148.58,7.14 ; PWM2.27@222.8,63.6 219.6,63.6 218.6,62.6 v1(218.6,60.3) 233.9,60.3 234.7,61.1 281.744,61.1 H1.20@292.881,49.963
  Bottom Layer w0.3: H4.13@43.68,7.14 43.68,13.78 45.2,15.3 v1(81.2,15.3) ; v1(73,112) v1(94.4,90.6) 94.4,90.439 94.9,89.939 94.9,85.9 93.7,84.7 87.9,78.9 v1(87.9,15.676) 88.076,15.5 v1(148.5,15.5) 208.7,15.5 ; v1(218.6,60.3) 208.7,50.4 208.7,15.5 ; H2.17@263.64,7.14 263.64,9.96 258.1,15.5 208.7,15.5
T555: J5-1.4 R1-33.1 Timer1.3 | length 28.9
  Top Layer w0.3: v1(55,72.3) 55,73.6 R1-33.1@55.1,73.7 ; v1(55.3,80.9) 55.462,80.9 55.662,81.1 Timer1.3@57.3,81.1
  Bottom Layer w0.3: v1(55.3,80.9) 55.3,80.738 55,80.438 v1(55,72.3) 56.1,71.2 68.58,71.2 J5-1.4@70.4,73.02
TT: C9-1.2 R9-1.1 Timer1.2 Timer1.6 | length 12.3
  Top Layer w0.3: Timer1.2@57.3,82.37 59.392,82.37 60.662,81.1 Timer1.6@63.1,81.1 64.694,81.1 64.794,81 65.5,81 R9-1.1@65.8,80.7 C9-1.2@65.8,77.6
Vin: C3-2.1 C3-2B.1 CE-1.1 CE-1B.1 H3.1 H3.2 H4.1 H4.2 I1-1.2 LED1-12.2 PS1.1 S1.3 S1.13 S1.18 S2.3 S2.13 S2.18 S3.3 S3.13 S3.18 S4.3 S4.13 S4.18 Terminal1.1 Terminal1.3 Terminal1.5 Terminal1.7 Terminal1.9 Terminal1.11 Terminal1.13 Terminal1.15 Terminal1.17 Terminal1.19 Terminal1.21 Terminal1.23 Terminal1.25 Terminal1.27 Terminal1.29 Terminal1.31 | length 689.7
  Top Layer w0.254: LED1-12.2@28.1,25.5 30.3,25.5 30.5,25.7
  Top Layer w0.3: CE-1B.1@15,158.9 15,157.9 15.6,157.3 CE-1B.1@15.6,157.05 ; v1(21.5,167.8) 23,167.8 23.464,167.336 S1.18@23.464,165.8 ; v1(22.2,156.7) 22.3,156.7 23.464,157.864 S1.3@23.464,159.4 ; S1.13@26.714,165.8 26.714,167.314 28.7,169.3 v1(29.6,169.3) ; v1(34.4,167.8) 35.4,167.8 36.175,167.025 S2.18@36.175,165.85 ; v1(35.1,157.6) 35.6,157.6 36.175,158.175 S2.3@36.175,159.45 ; S2.13@39.425,165.85 39.425,167.425 40.7,168.7 41.838,168.7 42.438,169.3 v1(42.6,169.3) ; v1(46.4,167.8) 47.3,167.8 48.05,167.05 48.05,166.041 S3.18@48.075,166.016 ; v1(47.3,157.3) 48.075,158.075 S3.3@48.075,159.616 ; S3.13@51.325,166.016 51.325,167.425 52.585,168.685 53.185,168.685 v1(53.3,168.8) ; v1(58.2,157.5) 59.7,157.5 59.975,157.775 S4.3@59.975,159.6 ; v1(58.378,167.774) 58.493,167.659 59.241,167.659 59.95,166.95 59.95,166.025 S4.18@59.975,166 ; S4.13@63.225,166 63.225,167.525 64.2,168.5 65.7,168.5 66,168.8 66.9,168.8 v1(67.8,169.7)
  Top Layer w1: 23.8,35.7 30.5,29 30.5,25.7 30.5,13.2 33.2,10.5 62.4,10.5 65.5,7.4 65.5,4.886 64.914,4.3 ; H4.2@58.92,4.6 H4.1@61.46,4.6 61.875,4.6 62.175,4.3 64.914,4.3 ; v2(111.8,12.6) 104.9,5.7 72.8,5.7 71.4,4.3 64.914,4.3 ; H3.2@163.82,4.6 H3.1@166.36,4.6 169.4,4.6 170.9,6.1 v2(170.9,12.7)
  Top Layer w3: v2(16.561,35.288) 18.873,37.6 21.9,37.6 23.8,35.7 ; v2(16.561,37.6) v2(18.2,37.6)
  Top Layer w4: v2(11.6,161.9) v2(13.2,161.9) v2(14.7,161.9) v2(16.3,161.9)
  Top Layer w5: I1-1.2@12.242,24.932 12.3,24.99 CE-1.1@12.3,31.7 15.888,35.288 ; v2@14.124,35.198 v2@14.124,35.224 ; v2(14.124,37.5) v2@14.124,35.224 ; v2@16.5,37.6 v2@14.124,35.224
  Bottom Layer w0.3: 20.25,159.85 20.25,166.55 v1(21.5,167.8) ; v1(22.2,156.7) 22.2,158.8 22.3,158.9 ; 29.4,158.9 29.4,169.1 v1(29.6,169.3) ; v1(35.1,157.6) 35.1,158.9 ; 41.1,158.9 41.1,167.8 v1(42.6,169.3) ; 46,158.9 46,167.4 v1(46.4,167.8) ; v1(47.3,157.3) 47.9,157.9 47.9,158.9 ; 52.4,158.9 52.4,167.9 v1(53.3,168.8) ; 57.7,158.9 57.7,167.096 v1(58.378,167.774) ; v1(58.2,157.5) 58.6,157.9 58.6,158.9 ; 65.4,158.9 65.4,167.3 v1(67.8,169.7)
  Bottom Layer w0.5: 33.4,158.9 33.4,166.8 v1(34.4,167.8)
  Bottom Layer w1: v2(16.5,160.3) 19.8,160.3 20.25,159.85 21.2,158.9 22.3,158.9 29.4,158.9 33.4,158.9 35.1,158.9 41.1,158.9 46,158.9 47.9,158.9 52.4,158.9 57.7,158.9 58.6,158.9 65.4,158.9 ; v2(111.8,12.6) 170.8,12.6 v2(170.9,12.7)
  Bottom Layer w5: 4.5,49.5 4.5,41.9 8.8,37.6 14.25,37.6 v2(16.561,35.288) ; v2(14.113,35.187) 14.113,37.488 v2(14.124,37.5)
  Bottom Layer w8: 4.5,49.5 4.5,55.7 13.3,64.5 13.3,75 5.1,83.2 5.1,139 13.7,147.6 13.7,160 5.3,168.4 5.3,222.2 Terminal1.1@12.1,229 Terminal1.3@15.6,229 Terminal1.5@19.1,229 Terminal1.7@22.6,229 Terminal1.9@26.1,229 Terminal1.11@29.6,229 Terminal1.13@33.1,229 Terminal1.15@36.6,229 Terminal1.17@40.1,229 Terminal1.19@43.6,229 Terminal1.21@47.1,229 Terminal1.23@50.6,229 Terminal1.25@54.1,229 Terminal1.27@57.6,229 Terminal1.29@61.1,229 Terminal1.31@64.6,229
  other v2: 15.4,34.1 12.7,34.3 11.6,35.4 18.2,35.9 12.9,36.5 15.5,36.6 16.4,39.2 11.6,160.4 13.3,160.4
VinRaw: C3-1.1 I1-1.1 Jack1.1 | length 9
  Top Layer w3: Jack1.1@12.2,10.35 12.45,10.1 15.9,10.1 C3-1.1@16,10
  Top Layer w4: Jack1.1@12.2,10.35 12.2,15.39 I1-1.1@12.242,15.432
pads on no net: ADC1.0 ADC2.0 ADC3.0 ADC4.0 ADC5.0 ADC6.0 ADC7.0 ADC8.0 Camera1.0 Camera1.2 Cnt3.12 DAC1.0 DAC2.0 DAC3.0 DAC4.0 DAC5.0 DAC6.0 DAC7.0 DAC8.0 GPIO13.0 GPIO25.0 GPIO26.0 GPIO27.0 GPIO28.0 GPIO29.0 GPIO30.0 GPIO31.0 GPIO32.0 H1.12 H1.13 H1.15 H1.17 IN(5V)-1.0 IN(5V)-2.0 IN(5V)-3.0 IN(5V)-4.0 Jack1.0 LA0.0 LA1.0 LA2.0 LA3.0 LA4.0 LA5.0 LA6.0 LA7.0 LA8.0 LA9.0 LB0.0 LB1.0 LB2.0 LB3.0 LB4.0 LB5.0 LB6.0 LB7.0 LB8.0 LB9.0 LC0.0 LC1.0 LC2.0 LC3.0 LC4.0 LC5.0 LC6.0 LC7.0 LC8.0 LC9.0 LvL-1.7 LvL-1.8 LvL-1.9 LvL-1.10 LvL-1.14 LvL-1.15 LvL-1.16 LvL-1.17 LvL-2.9 LvL-2.10 LvL-2.14 LvL-2.15 LvL-3.8 LvL-3.9 LvL-3.10 LvL-3.14 LvL-3.15 LvL-3.16 N1.1 N2.1 OUT(5V)-1.0 OUT(5V)-2.0 OUT(5V)-3.0 OUT(5V)-4.0 Ref1.1 Ref1.3 Ref1.5 Ref1.7 Ref1.8 S1.9 S1.10 S2.9 S2.10 S3.9 S3.10 S4.9 S4.10 ShiftLED1.2 VReg1.0 VReg2.0 WD1.3

## Polygon pours and split planes (outlines as drawn)
GND on Bottom Layer "NONET_L01_P-001" (solid, remove dead copper, pour order 3): 0,0 0,25.5 9.5,25.5 9.6,63.4 12.5,66.3 70.6,66.3 77.6,73.3 77.6,94.6 70.1,102.1 70.1,139.5 73.6,143 73.6,250 300,250 300,0
GND on Bottom Layer "NONET_L01_P-001" (solid, remove dead copper, pour order 0): 0,26.5 8.5,26.5 8.5,63.67 12.13,67.3 70.1,67.3 76.6,73.8 76.6,93.4 68.3,101.7 68.3,139.1 72.4,143.2 72.4,250 0,250
GND on Bottom Layer "NONET_L01_P-001" (solid, pour order 4): 0,27.3 8.5,27.3 8.5,25.1 0,25.1
GND on Top Layer "NONET_L01_P-001" (solid, remove dead copper, pour order 2): 0,0 0,25.5 9.5,25.5 9.6,63.4 12.5,66.3 70.6,66.3 77.6,73.3 77.6,94.6 70.1,102.1 70.1,139.5 73.6,143 73.6,250 300,250 300,0
GND on Top Layer "NONET_L01_P-001" (solid, remove dead copper, pour order 1): 0,26.5 8.5,26.5 8.5,63.67 12.13,67.3 70.1,67.3 76.6,73.8 76.6,93.4 68.3,101.7 68.3,139.1 72.4,143.2 72.4,250 0,250
GND on Top Layer "NONET_L01_P-001" (solid, pour order 5): 0,27.3 8.5,27.3 8.5,25.1 0,25.1

## Silkscreen, mask and mechanical layers (free items; w line width, h text height)
Top Overlay:
  circle w0.125: c35.7,96.1 r20
  circle w0.125: c35.7,96.1 r25
  circle w0.125: c35.7,96.1 r15
  lines w0.5: 288.8,125.909 77.632,125.909 77.632,146.269 288.8,146.269 288.8,126 ; 288.8,193.109 77.632,193.109 77.632,213.469 288.8,213.469 288.8,193.2 ; 77.632,159.509 288.8,159.509 288.8,179.869 77.632,179.869 77.632,159.509 ; 77.66,226.62 77.66,246.98 176.81,246.98 176.81,226.62 77.66,226.62 ; 189.66,226.62 288.81,226.62 288.81,246.98 189.66,246.98 189.66,226.62 ; 272.4,92.009 288.8,92.009 288.8,112.369 272.4,112.369 272.4,92.009
  text "-(Sw)" at 65.47,237.2 h2
  text "+(Vin)" at 66.84,228.77 h2
  text "4x Digital In (0-5V)" at 79.15,227.716 h2
  text "4x Digital Out (0-5V)" at 191.15,227.616 h2
  text "16x Power Switch" at 10.62,219.72 h2
  text "Voltage/Current limit determined by power supply VIn" at 42.54,219.17 h0.7
  text "Same as 31" at 286.9,201.1 h0.7 r90
  text "Options: In/Out, 3.3V/5V/Direct" at 118.767,200.407 h0.7
  text "Options: In/Out, 3.3V/5V/Direct" at 146.583,200.373 h0.7
  text "Options: In/Out, 3.3V/5V/Direct" at 174.683,200.373 h0.7
  text "Options: In/Out, 3.3V/5V/Direct" at 90.9,200.3 h0.7
  text "Options: In/Out, 3.3V/5V, Shared with Expansion 1+2" at 258.2,199.7 h0.7
  text "Options: In/Out, 3.3V, / Analog In, Shared with Magnet/Expansion 1+2" at 230.28,199.18 h0.7
  text "Options: In/Out, 3.3V, / Analog In, Shared with Magnet/Expansion 1+2" at 202.35,199.12 h0.7
  text "8x GPIO" at 79.385,194.29 h2
  text "Options: Shared with Magnet/Expansion 1" at 90.857,166.942 h0.7
  text "Options: Shared with Expansion 1" at 118.757,166.942 h0.7
  text "Options: Shared with Expansion 2" at 146.627,166.939 h0.7
  text "Options: Shared with Expansion 2" at 174.536,166.801 h0.7
  text "8x Analog In (0-3.3V)" at 79.185,160.657 h2
  text "Can accept larger V if you use resistor dividers at ADC input" at 119.5,160.3 h0.7
  text "Options: Shared with LED Drive" at 90.758,133.281 h0.7
  text "Options: Shared with Magnet" at 118.94,132.98 h0.7
  text "Options: Shared with Magnet" at 146.68,132.92 h0.7
  text "Options: Shared with Expansion 1+2" at 174.538,132.85 h0.7
  text "8x Analog Out (0-3.3V)" at 79.085,126.957 h2
  text "0" at 35.18,124.1 h2
  text "x100" at 37.95,121.32 h1.5
  text "9" at 18.3,118.34 h2
  text "1" at 51.62,118.3 h2
  text "Ready to plug new connection?" at 180.95,117.216 h2
  text "ADC Filter/ / Voltage Divider" at 76.7,116.34 h0.7
  text "x10" at 38.33,116.22 h1.5
  text "YES" at 197.85,111.916 h2
  text "NO" at 211.111,111.916 h2
  text "x1" at 38.42,111.29 h1.5
  text "Options: In/Out, 3.3V/5V/Direct, Share with Camera Spare" at 273.22,108.02 h0.7
  text "2" at 62.48,104.06 h2
  text "8" at 8.17,103.95 h2
  text "IO Enable" at 180.95,93.45 h2
  text "3" at 62.52,86.3 h2
  text "7" at 7.92,86.12 h2
  text "Heartbeat" at 144.196,81.65 h2
  text "USB" at 98.996,77.85 h2
  text "4" at 51.99,71.99 h2
  text "6" at 18.52,71.88 h2
  text "5" at 35.18,66.52 h2
  text "5V" at 55.38,49.55 h2
  text "3.3V" at 53.99,35.56 h2
  text "LED Drive" at 290.25,29.95 h2 r90
  text "Split grounds to here separate high current switches" at 0.3,28 h0.5
  text "Camera" at 284.95,22.65 h2
  text "6.5V" at 33.45,21.95 h2
  text "Power" at 21.85,21.85 h2
  text "Sync Board V1.0 / H. Steel / 29/10/2023" at 125.78,21.65 h4
  text "Expansion 2" at 40.05,10.916 h2
  text "Expansion 1" at 144.85,10.916 h2
  text "Magnet Drive" at 248.45,10.916 h2
  text "12V" at 13.94,4.43 h2
Mechanical 1:
  the board outline again, w0.254

## Text inside footprints (layer, text, board x,y; h text height)
ADC: Top Overlay "1" at 92.546,99.1 h0.8 r270
Cnt1: Top Overlay "1" at 29.4,100.45 h0.8
Cnt2: Top Overlay "1" at 29.5,94.1 h0.8
Cnt3: Top Overlay "1" at 42.5,91.6 h0.8 r180
DAC-1: Top Overlay "1" at 139.346,95.85 h0.8 r180
DIR_13=OUT: Top Overlay "+" at 258.8,72.404 h1 r180
DIR_25=OUT: Top Overlay "+" at 240.7,104.304 h1 r180
DIR_26=OUT: Top Overlay "+" at 240.7,94.404 h1 r180
DIR_27=OUT: Top Overlay "+" at 240.8,83.404 h1 r180
DIR_28=OUT: Top Overlay "+" at 258.8,104.604 h1 r180
DIR_31=OUT: Top Overlay "+" at 258.5,94.404 h1 r180
DIR_32=OUT: Top Overlay "+" at 258.4,83.304 h1 r180
J1-12: Top Overlay "2" at 112.102,99.086 h0.8; Top Overlay "3" at 114.642,99.086 h0.8; Top Overlay "1" at 109.562,99.086 h0.8
J1-13: Top Overlay "2" at 112.102,103.553 h0.8; Top Overlay "3" at 114.642,103.553 h0.8; Top Overlay "1" at 109.562,103.553 h0.8
J1-14: Top Overlay "2" at 112.102,108.02 h0.8; Top Overlay "3" at 114.642,108.02 h0.8; Top Overlay "1" at 109.562,108.02 h0.8
J1-15: Top Overlay "2" at 112.102,112.486 h0.8; Top Overlay "3" at 114.642,112.486 h0.8; Top Overlay "1" at 109.562,112.486 h0.8
J1-16: Top Overlay "2" at 149.962,93.986 h0.8; Top Overlay "3" at 152.502,93.986 h0.8; Top Overlay "1" at 147.422,93.986 h0.8
J1-17: Top Overlay "2" at 126.162,93.986 h0.8; Top Overlay "3" at 128.702,93.986 h0.8; Top Overlay "1" at 123.622,93.986 h0.8
J1-18: Top Overlay "2" at 149.962,98.986 h0.8; Top Overlay "3" at 152.502,98.986 h0.8; Top Overlay "1" at 147.422,98.986 h0.8
J1-19: Top Overlay "2" at 126.202,98.986 h0.8; Top Overlay "3" at 128.742,98.986 h0.8; Top Overlay "1" at 123.662,98.986 h0.8
J1-20: Top Overlay "2" at 178.126,105.196 h0.8 r90; Top Overlay "3" at 178.126,107.736 h0.8 r90; Top Overlay "1" at 178.126,102.656 h0.8 r90
J1-21: Top Overlay "2" at 174.682,105.196 h0.8 r90; Top Overlay "3" at 174.682,107.736 h0.8 r90; Top Overlay "1" at 174.682,102.656 h0.8 r90
J1-22: Top Overlay "2" at 171.237,105.196 h0.8 r90; Top Overlay "3" at 171.237,107.736 h0.8 r90; Top Overlay "1" at 171.237,102.656 h0.8 r90
J1-23: Top Overlay "2" at 167.793,105.196 h0.8 r90; Top Overlay "3" at 167.793,107.736 h0.8 r90; Top Overlay "1" at 167.793,102.656 h0.8 r90
J5-1: Top Overlay "3" at 74.165,75.194 h0.8; Top Overlay "2" at 70.164,79.414 h0.8; Top Overlay "4" at 69.978,71.018 h0.8; Top Overlay "1" at 69.013,75.006 h0.8; Top Overlay "5" at 66.064,75.194 h0.8
J6: Top Overlay "2" at 62.396,71.786 h0.8; Top Overlay "1" at 59.856,71.786 h0.8
Jack1: Top Overlay "->" at 7,1.95 h1 r270
LA0: Top Overlay "+" at 36.971,108.7 h1 r90.13
LA1: Top Overlay "+" at 44.136,105.597 h1 r54.18
LA2: Top Overlay "+" at 48.131,98.849 h1 r18.02
LA3: Top Overlay "+" at 47.506,91.054 h1 r342.09
LA4: Top Overlay "+" at 42.225,85.219 h1 r306.03
LA5: Top Overlay "+" at 34.612,83.493 h1 r270.09
LA6: Top Overlay "+" at 27.61,86.588 h1 r229.49
LA7: Top Overlay "+" at 23.582,93.307 h1 r196.8
LA8: Top Overlay "+" at 24.2,101.131 h1 r162
LA9: Top Overlay "+" at 29.373,106.989 h1 r126
LB0: Top Overlay "+" at 37.001,113.687 h1 r90
LB1: Top Overlay "+" at 47.109,109.622 h1 r54
LB2: Top Overlay "+" at 52.897,100.393 h1 r18
LB3: Top Overlay "+" at 52.155,89.524 h1 r342
LB4: Top Overlay "+" at 45.166,81.166 h1 r306
LB5: Top Overlay "+" at 34.599,78.513 h1 r270
LB6: Top Overlay "+" at 24.491,82.578 h1 r234
LB7: Top Overlay "+" at 18.703,91.807 h1 r198
LB8: Top Overlay "+" at 19.445,102.676 h1 r162
LB9: Top Overlay "+" at 26.434,111.034 h1 r126
LC0: Top Overlay "+" at 37.001,118.687 h1 r90
LC1: Top Overlay "+" at 50.048,113.667 h1 r54
LC2: Top Overlay "+" at 57.666,101.946 h1 r18.01
LC3: Top Overlay "+" at 56.91,87.978 h1 r342
LC4: Top Overlay "+" at 48.105,77.121 h1 r306
LC5: Top Overlay "+" at 34.599,73.434 h1 r270
LC6: Top Overlay "+" at 21.409,78.493 h1 r235.95
LC7: Top Overlay "+" at 14.002,90.149 h1 r196.14
LC8: Top Overlay "+" at 14.69,104.222 h1 r162
LC9: Top Overlay "+" at 23.495,115.079 h1 r126
LED1-8: Top Overlay "+" at 189.1,90.396 h1
LED1-9: Top Overlay "+" at 39.3,24.496 h1
LED1-10: Top Overlay "+" at 54.9,49.204 h1 r180
LED1-11: Top Overlay "+" at 54.9,35.304 h1 r180
LED1-12: Top Overlay "+" at 28.8,24.296 h1
LED1-13: Top Overlay "+" at 103.346,75.096 h1
LED1-14: Top Overlay "+" at 149.846,80.404 h1 r180
MCU1: Top Overlay "0" at 98.436,56.25 h0.8 r90; Top Overlay "1" at 100.976,56.25 h0.8 r90; Top Overlay "G" at 95.896,56.25 h0.8 r90
NOT_OK: Top Overlay "+" at 216.5,113.904 h1 r180
OK: Top Overlay "+" at 192.2,113.904 h1 r180
T1: Top Overlay "GND" at 294.05,86.25 h1
T2: Top Overlay "GND" at 116.05,8.75 h1
T3: Top Overlay "GND" at 15.65,57.15 h1
Terminal1: Top Overlay "->" at 38.1,226.9 h0.5 r270